# Altium PCB 数码管灯.PcbDoc
Units mil, origin at the board's own origin, x right, y up, seen from the top; angles counter-clockwise.
Board outline 777.2 x 2362.2 mil, 2 copper layers (Top Layer, Bottom Layer); 23 components, 39 nets, 110 pads, 18 vias.
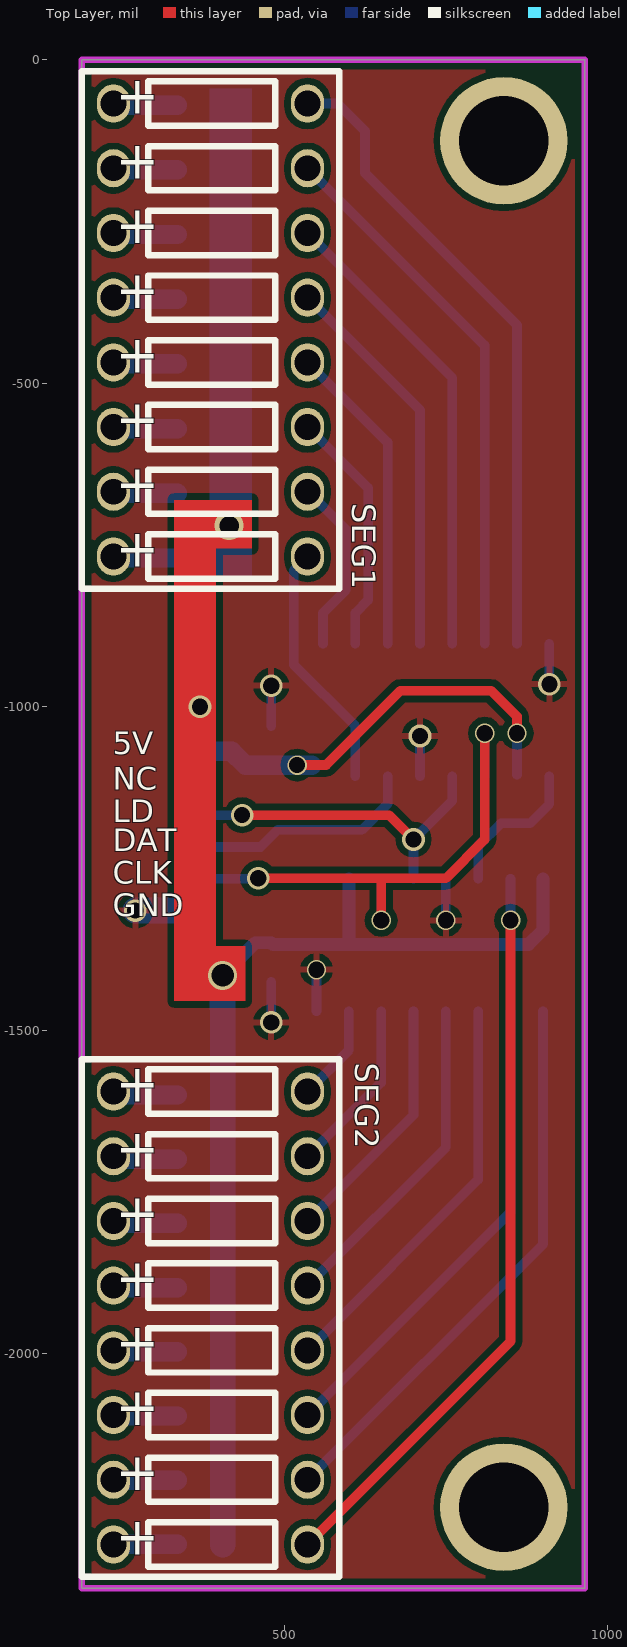
[diagram p0: Top Layer view]
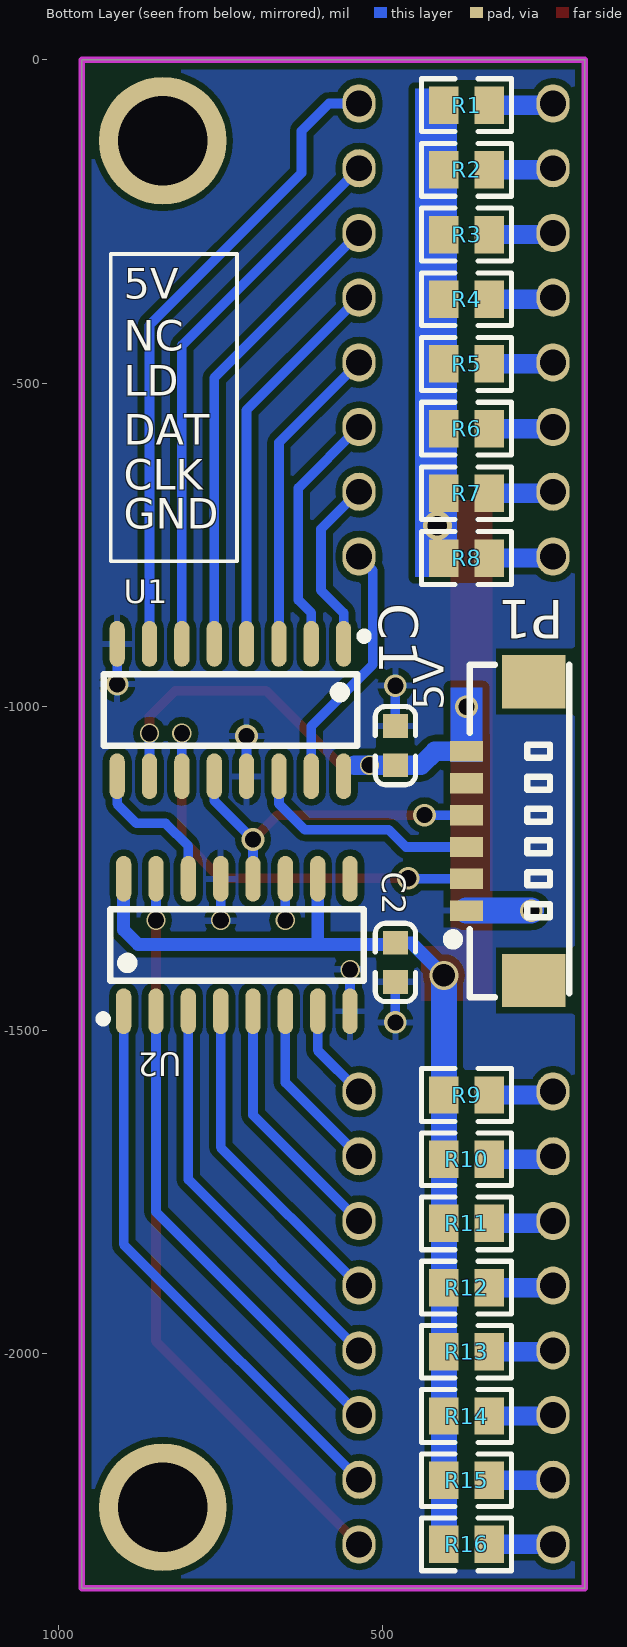
[diagram p1: Bottom Layer view, seen from below]
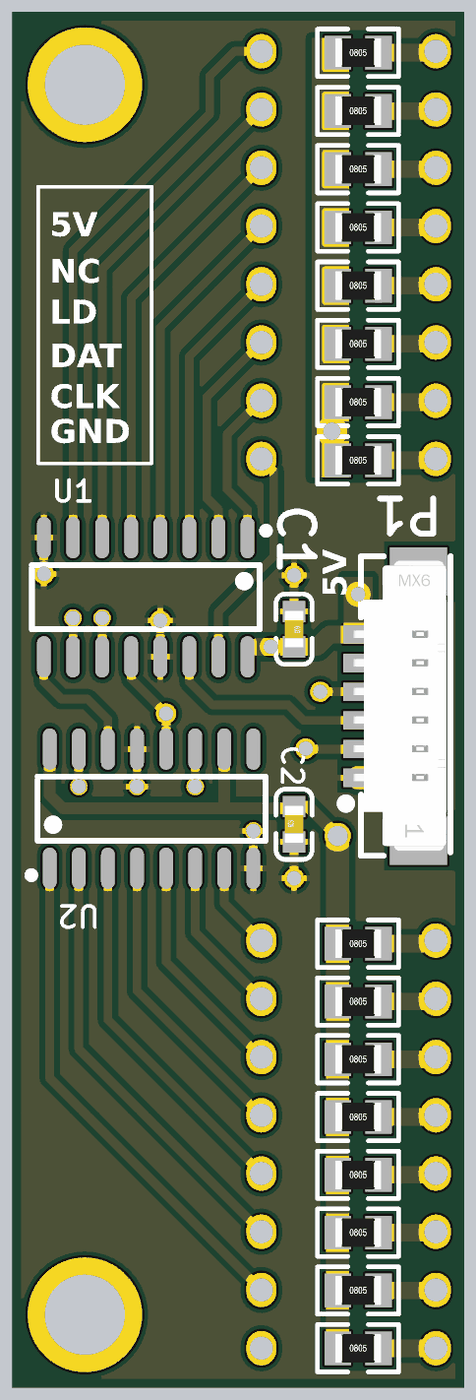
[diagram p2: 3D render of the assembled board from below, using the file's embedded part models]

## Layer stack, top to bottom
Top Solder: solder mask 0.4, Solder Resist, Dk 3.5
Top Layer: signal copper 1.4
Dielectric 1: dielectric 12.6, FR-4, Dk 4.8
Bottom Layer: signal copper 1.4
Bottom Solder: solder mask 0.4, Solder Resist, Dk 3.5

## Board outline
187.36,-2362.2 964.57,-2362.2 964.57,0 187.36,0

## Design rules (kind name [scope] priority, off if disabled: settings)
Clearance [All] p1: gap=10
ComponentClearance [All] p1: gap=0 collisioncheckmode=3 verticalgap=10 showdistances=FALSE
PlaneConnect [All] p1: planeconnectstyle=Direct reliefexpansion=20 reliefentries=4 reliefconductorwidth=10 reliefairgap=10
PolygonConnect [All] p1: connectstyle=Relief reliefconductorwidth=10 reliefentries=4 polygonreliefangle="90 Angle" airgapwidth=10
RoutingVias [All] p1: holewidth=28 width=50 viastyle="Through Hole" minholewidth=28 minwidth=50 maxholewidth=28 maxwidth=50
SolderMaskExpansion [All] p1: expansion=4
Width [All] p1: maxlimit=40 minlimit=10 preferedwidth=10 minimp=50.000000 maximp=50.000000 favimp=50.000000
28 further rules are at their usual default settings.

## Components (designator, comment, footprint, x,y, rotation, side; value= is the part's Value field where it differs from the comment)
C1 "100nF" LC-0603_C 480,-1060 r270 bottom
C2 "100nF" LC-0603_C 480,-1395 r90 bottom
P1 "Header 6" "MX 1.25-LS-6P" 281,-1191.43 r90 bottom
R1 "470Ω" LC-0805_R 370,-70 r180 bottom
R2 "470Ω" LC-0805_R 370,-170 r180 bottom
R3 "470Ω" LC-0805_R 370,-270 r180 bottom
R4 "470Ω" LC-0805_R 370,-370 r180 bottom
R5 "470Ω" LC-0805_R 370,-470 r180 bottom
R6 "470Ω" LC-0805_R 370,-570 r180 bottom
R7 "470Ω" LC-0805_R 370,-670 r180 bottom
R8 "470Ω" LC-0805_R 370,-770 r180 bottom
R9 "470Ω" LC-0805_R 370,-1600 r180 bottom
R10 "470Ω" LC-0805_R 370,-1699.23 r180 bottom
R11 "470Ω" LC-0805_R 370,-1798.47 r180 bottom
R12 "470Ω" LC-0805_R 370,-1897.7 r180 bottom
R13 "470Ω" LC-0805_R 370,-1996.93 r180 bottom
R14 "470Ω" LC-0805_R 370,-2096.16 r180 bottom
R15 "470Ω" LC-0805_R 370,-2195.4 r180 bottom
R16 "470Ω" LC-0805_R 370,-2294.63 r180 bottom
SEG1 "SEG_LED_8" SEG_LEDx8 236.18,-67.57 r270 top locked
SEG2 "SEG_LED_8" SEG_LEDx8 236.18,-1594.63 r270 top locked
U1 "74HC595D" LC-SOIC-16_150mil-3D 735,-1005 r0 bottom
U2 "74HC595D" LC-SOIC-16_150mil-3D 725,-1368.15 r180 bottom

## Footprints (in the part's own frame and the unit in brackets; to place one, negate y for a bottom-side part, rotate by r counter-clockwise, add the part's x,y. Pads: shape width x height; smd on the part's side, far side on the other; paste and mask are expansions set on the pad)
LC-0603_C [mm]
  rect 0.93x0.98 smd: 1(-0.77,0) 2(0.77,0)
  silkscreen extent -1.53,-0.79 1.54,0.79, body extent -0.8,-0.4 0.8,0.4, height 0.3
LC-0805_R [mm]
  rect 1.16x1.47 smd: 1(-0.89,0) 2(0.89,0)
  silkscreen extent -1.77,-1.04 1.77,1.03, body extent -1,-0.63 1,0.63, height 0.49
LC-SOIC-16_150mil-3D [mm]
  oval 0.6x1.8 smd: 1(-4.445,-2.6) 2(-3.175,-2.6) 3(-1.905,-2.6) 4(-0.635,-2.6) 5(0.635,-2.6) 6(1.905,-2.6) 7(3.175,-2.6) 8(4.445,-2.6) 9(4.445,2.6) 10(3.175,2.6) 11(1.905,2.6) 12(0.635,2.6) 13(-0.635,2.6) 14(-1.905,2.6) 15(-3.175,2.6) 16(-4.445,2.6)
  silkscreen extent -5.4,-3.05 4.97,1.4, body extent -5.08,-2.03 5.08,2.03, height 1
"MX 1.25-LS-6P" [mm] "长：12.25m，宽：3.7mm，高：4.7mm"
  rect 2.1x2.5 smd: 0(-5.882,-0.381) 0(5.854,-0.381)
  rect 0.8x1.3 smd: 1(-3.139,2.261) 2(-1.889,2.261) 3(-0.639,2.261) 4(0.611,2.261) 5(1.861,2.261) 6(3.111,2.261)
  silkscreen extent -6.54,-1.78 6.52,2.99, body extent -6.32,-1.6 6.32,2.5, height 4.7
SEG_LEDx8 [mm]
  oval 1.5x1.3 hole 1.016: 1(0,0) 2(2.54,0) 3(5.08,0) 4(7.62,0) 5(10.16,0) 6(12.7,0) 7(15.24,0) 8(17.78,0) 9(17.78,7.62) 10(15.24,7.62) 11(12.7,7.62) 12(10.16,7.62) 13(7.62,7.62) 14(5.08,7.62) 15(2.54,7.62) 16(0,7.62)
  silkscreen extent -1.27,-1.24 19.05,8.86, body extent -1.27,-1.27 19.18,8.89, height 7.5

## Part data
C1 C2: library part "0603 100nF (104) 10% 50V", "贴片电容"
P1: "Header, 6-Pin"
R1 R2 R3 R4 R5 R6 R7 R8 R9 R10 R11 R12 R13 R14 R15 R16: library part "0805 470Ω (4700) 1%", "贴片电阻"
U1 U2: "74系列逻辑芯片"

## Free pads (board coordinates)
  round 196.85 hole 137.8: 0(839.57,-2237.2) 0(839.57,-125)

## Via types
v1: diameter 35, hole 25, Top Layer to Bottom Layer, 9 vias
v2: diameter 30, hole 25, Top Layer to Bottom Layer, 7 vias
v3: diameter 45, hole 35, Top Layer to Bottom Layer, 1 vias
v4: diameter 45, hole 30, Top Layer to Bottom Layer, 1 vias

## Nets (pads, with @x,y where several pads share a name; then routed paths per layer and width w, separated by ;. In a path a pad name is that pad's centre, name@x,y a point inside that pad or via, vN(x,y) a via of type N, cw(c..) or ccw(c..) an arc to the next point about the centre after c; other vN are vias at no path point)
5V: C1.2 C2.2 P1.6 R1.1 R2.1 R3.1 R4.1 R5.1 R6.1 R7.1 R8.1 R9.1 R10.1 R11.1 R12.1 R13.1 R14.1 R15.1 R16.1 U1.10 U1.16 U2.10 U2.16 | length 2317
  Top Layer w15: v2(520,-1090) 565,-1090 680,-975 820,-975 860,-1015 v2(860,-1040.79)
  Bottom Layer w15: U1.10@860,-1105 v2(860,-1040.79)
  Bottom Layer w20: v3(405,-1415) 455.31,-1364.68 C2.2 482.81,-1367.5 600,-1367.5 ; U2.10 600,-1367.5 ; U2.16 900,-1345 877.5,-1367.5 600,-1367.5
  Bottom Layer w30: P1.6 418.94,-1068.94 440.31,-1090.32 C1.2 542.95,-1090.32
  Bottom Layer w40: v3(405,-1415) 405,-1465 405.04,-1465.04 R9.1 R10.1 R11.1 R12.1 R13.1 R14.1 R15.1 R16.1 ; R8.1 415,-760.04 v4(415,-720)
  other v1: 370,-1000
GND: C1.1 C2.1 P1.1 U1.8 U1.13 U2.8 U2.13 | length 477.9
  Bottom Layer w15: v1(480,-1487.68) C2.1 ; C1.1 v1(480,-967.32) ; U2.8 v2(550,-1406.3) ; U1.13 v1(710,-1045) ; v2(750,-1330) U2.13 ; v1(910,-965) U1.8
  Bottom Layer w40: v1(270,-1315) P1.1
IOB_MOSI: P1.3 U1.14 | length 360.2
  Bottom Layer w15: P1.3 463.43,-1216.57 490,-1190 620,-1190 660,-1150 U1.14
IOB_SCLK: P1.2 U1.11 U2.11 | length 821
  Top Layer w15: v1(460,-1265) 650,-1265 ; v2(650,-1330) 650,-1265 ; v2@810,-1045 810,-1205 750,-1265 650,-1265
  Bottom Layer w15: P1.2 459.21,-1265.79 v1(460,-1265) ; v2(650,-1330) U2.11 ; U1.11 v2(810,-1040.79)
IOB_UD: P1.4 U1.12 U2.12 | length 528.9
  Top Layer w15: v1(435,-1167.36) 662.36,-1167.36 v1(700,-1205)
  Bottom Layer w15: P1.4 v1(435,-1167.36) ; U2.12 v1(700,-1205) 760,-1145 U1.12
NetR1_2: R1.2 SEG1.1 | length 99.8
  Bottom Layer w30: SEG1.1 238.61,-70 R1.2
NetR2_2: R2.2 SEG1.2 | length 99.8
  Bottom Layer w30: SEG1.2 238.61,-170 R2.2
NetR3_2: R3.2 SEG1.3 | length 99.8
  Bottom Layer w30: SEG1.3 238.61,-270 R3.2
NetR4_2: R4.2 SEG1.4 | length 99.8
  Bottom Layer w30: SEG1.4 238.61,-370 R4.2
NetR5_2: R5.2 SEG1.5 | length 99.8
  Bottom Layer w30: SEG1.5 238.61,-470 R5.2
NetR6_2: R6.2 SEG1.6 | length 99.8
  Bottom Layer w30: SEG1.6 238.61,-570 R6.2
NetR7_2: R7.2 SEG1.7 | length 99.8
  Bottom Layer w30: SEG1.7 238.61,-670 R7.2
NetR8_2: R8.2 SEG1.8 | length 99.8
  Bottom Layer w30: SEG1.8 238.61,-770 R8.2
NetR9_2: R9.2 SEG2.1 | length 101
  Bottom Layer w30: SEG2.1 241.55,-1600 R9.2
NetR10_2: R10.2 SEG2.2 | length 100.7
  Bottom Layer w30: SEG2.2 240.78,-1699.23 R10.2
NetR11_2: R11.2 SEG2.3 | length 100.4
  Bottom Layer w30: SEG2.3 240.02,-1798.47 R11.2
NetR12_2: R12.2 SEG2.4 | length 100.1
  Bottom Layer w30: SEG2.4 239.25,-1897.7 R12.2
NetR13_2: R13.2 SEG2.5 | length 99.7
  Bottom Layer w30: SEG2.5 238.48,-1996.93 R13.2
NetR14_2: R14.2 SEG2.6 | length 99.4
  Bottom Layer w30: SEG2.6 237.72,-2096.16 R14.2
NetR15_2: R15.2 SEG2.7 | length 99.1
  Bottom Layer w30: SEG2.7 236.95,-2195.4 R15.2
NetR16_2: R16.2 SEG2.8 | length 98.8
  Bottom Layer w30: SEG2.8 R16.2
ODAT1: U1.9 U2.14 | length 230.3
  Bottom Layer w15: U2.14 800,-1215 835,-1180 880,-1180 910,-1150 U1.9
ODAT2: U2.9
OUT0: SEG1.9 U1.15 | length 387.9
  Bottom Layer w15: SEG1.9 515,-788.76 515,-935 610,-1030 U1.15
OUT1: SEG1.10 U1.1 | length 274.7
  Bottom Layer w15: SEG1.10 537.57,-667.57 595,-725 595,-820 560,-855 U1.1
OUT2: SEG1.11 U1.2 | length 382.2
  Bottom Layer w15: SEG1.11 630,-661.39 630,-835 610,-855 U1.2
OUT3: SEG1.12 U1.3 | length 486.4
  Bottom Layer w15: SEG1.12 660,-591.39 U1.3
OUT4: SEG1.13 U1.4 | length 607.1
  Bottom Layer w15: SEG1.13 710,-541.39 U1.4
OUT5: SEG1.14 U1.5 | length 727.8
  Bottom Layer w15: SEG1.14 760,-491.39 U1.5
OUT6: SEG1.15 U1.6 | length 848.5
  Bottom Layer w15: SEG1.15 810,-441.39 U1.6
OUT7: SEG1.16 U1.7 | length 996.4
  Bottom Layer w15: SEG1.16 582.57,-67.57 625,-110 625,-175 860,-410 U1.7
OUT8: SEG2.9 U2.15 | length 1174.6
  Top Layer w15: SEG2.9 850,-1980.81 v2(850,-1330)
  Bottom Layer w15: SEG2.9 SEG2.9@536.18,-2278.82 ; v2(850,-1330) U2.15
OUT9: SEG2.10 U2.1 | length 874.8
  Bottom Layer w15: SEG2.10 900,-1830.81 U2.1
OUT10: SEG2.11 U2.2 | length 754.1
  Bottom Layer w15: SEG2.11 850,-1780.81 U2.2
OUT11: SEG2.12 U2.3 | length 633.4
  Bottom Layer w15: SEG2.12 800,-1730.81 U2.3
OUT12: SEG2.13 U2.4 | length 512.7
  Bottom Layer w15: SEG2.13 750,-1680.81 U2.4
OUT13: SEG2.14 U2.5 | length 392
  Bottom Layer w15: SEG2.14 700,-1630.81 U2.5
OUT14: SEG2.15 U2.6 | length 271.3
  Bottom Layer w15: SEG2.15 650,-1580.81 U2.6
OUT15: SEG2.16 U2.7 | length 152.1
  Bottom Layer w15: SEG2.16@536.18,-1596.18 SEG2.16 600,-1530.81 U2.7
pads on no net: P1.0 P1.5

## Polygon pours and split planes (outlines as drawn)
GND on Top Layer "Bottom Layer-No Net" (solid, remove dead copper, pour order 0): 187.36,0 964.57,0 964.57,-2362.2 187.36,-2362.2
GND on Bottom Layer "Bottom Layer-No Net" (solid, remove dead copper, pour order 2): 964.57,-2362.2 187.36,-2362.2 187.36,0 964.57,0

## Keep-outs
Keep-Out Layer:
  lines w10: 187.36,-2362.2 187.36,-1537.2 187.36,-825 187.36,0 964.57,0 964.57,-2362.2 187.36,-2362.2

## Other copper
Top Layer:
  rectangle net 5V: 330,-1455 440,-1370
  rectangle net 5V: 330,-1455 395,-680
  rectangle net 5V: 330,-755 450,-680
Bottom Layer:
  rectangle net 5V: 345,-1085 395,-970
  rectangle net 5V: 385,-799.63 450,-44.63

## Silkscreen, mask and mechanical layers (free items; w line width, h text height)
Top Overlay:
  text "+" at 240,-102.94 h100
  text "+" at 240,-202.94 h100
  text "+" at 240,-302.94 h100
  text "+" at 240,-402.94 h100
  text "+" at 240,-502.94 h100
  text "+" at 240,-602.94 h100
  text "+" at 240,-702.94 h100
  text "+" at 240,-802.94 h100
  text "5V" at 235,-1085 h60
  text "NC" at 235,-1140 h60
  text "LD" at 235,-1190 h60
  text "DAT" at 235,-1235 h60
  text "CLK" at 235,-1285 h60
  text "GND" at 235,-1335 h60
  text "+" at 240,-1629.99 h100
  text "+" at 240,-1729.99 h100
  text "+" at 240,-1829.99 h100
  text "+" at 240,-1929.99 h100
  text "+" at 240,-2029.99 h100
  text "+" at 240,-2129.99 h100
  text "+" at 240,-2229.99 h100
  text "+" at 240,-2329.99 h100
Bottom Overlay:
  lines w6: 725,-775 725,-300 920,-300 920,-775 725,-775
  text "5V" at 899.93,-385 h80
  text "NC" at 900,-465 h80
  text "LD" at 899.93,-535 h80
  text "DAT" at 900,-610 h80
  text "CLK" at 900,-680 h80
  text "GND" at 900,-740 h80
  text "5V" at 390,-1005 h80 r270